# Altium PCB K882-BYKC6252.PcbDoc
Units mm, origin at the board's own origin, x right, y up, seen from the top; angles counter-clockwise.
Board outline 91.58 x 59.79 mm, 2 copper layers (Top, Bottom), stack 0.071 mm thick; 101 components, 70 nets, 257 pads, 142 vias.
Unrouted connection lines stored in the file: 91.
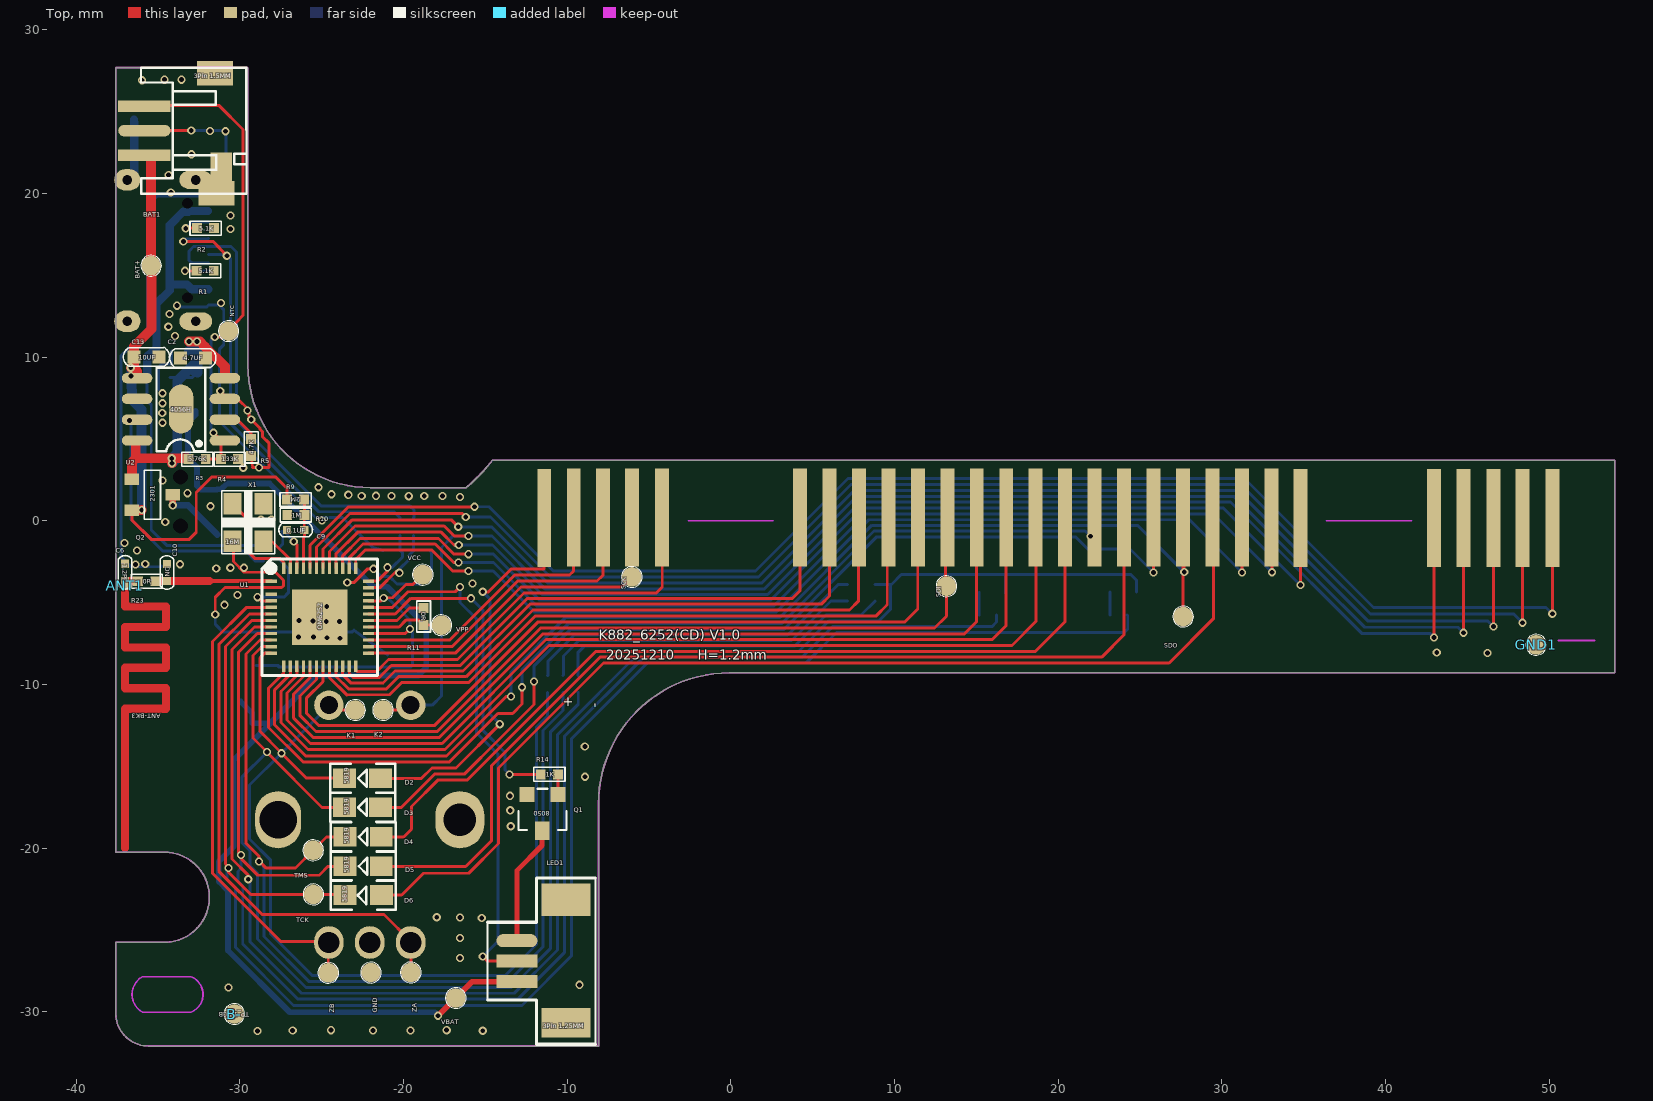
[diagram p0: Top view]
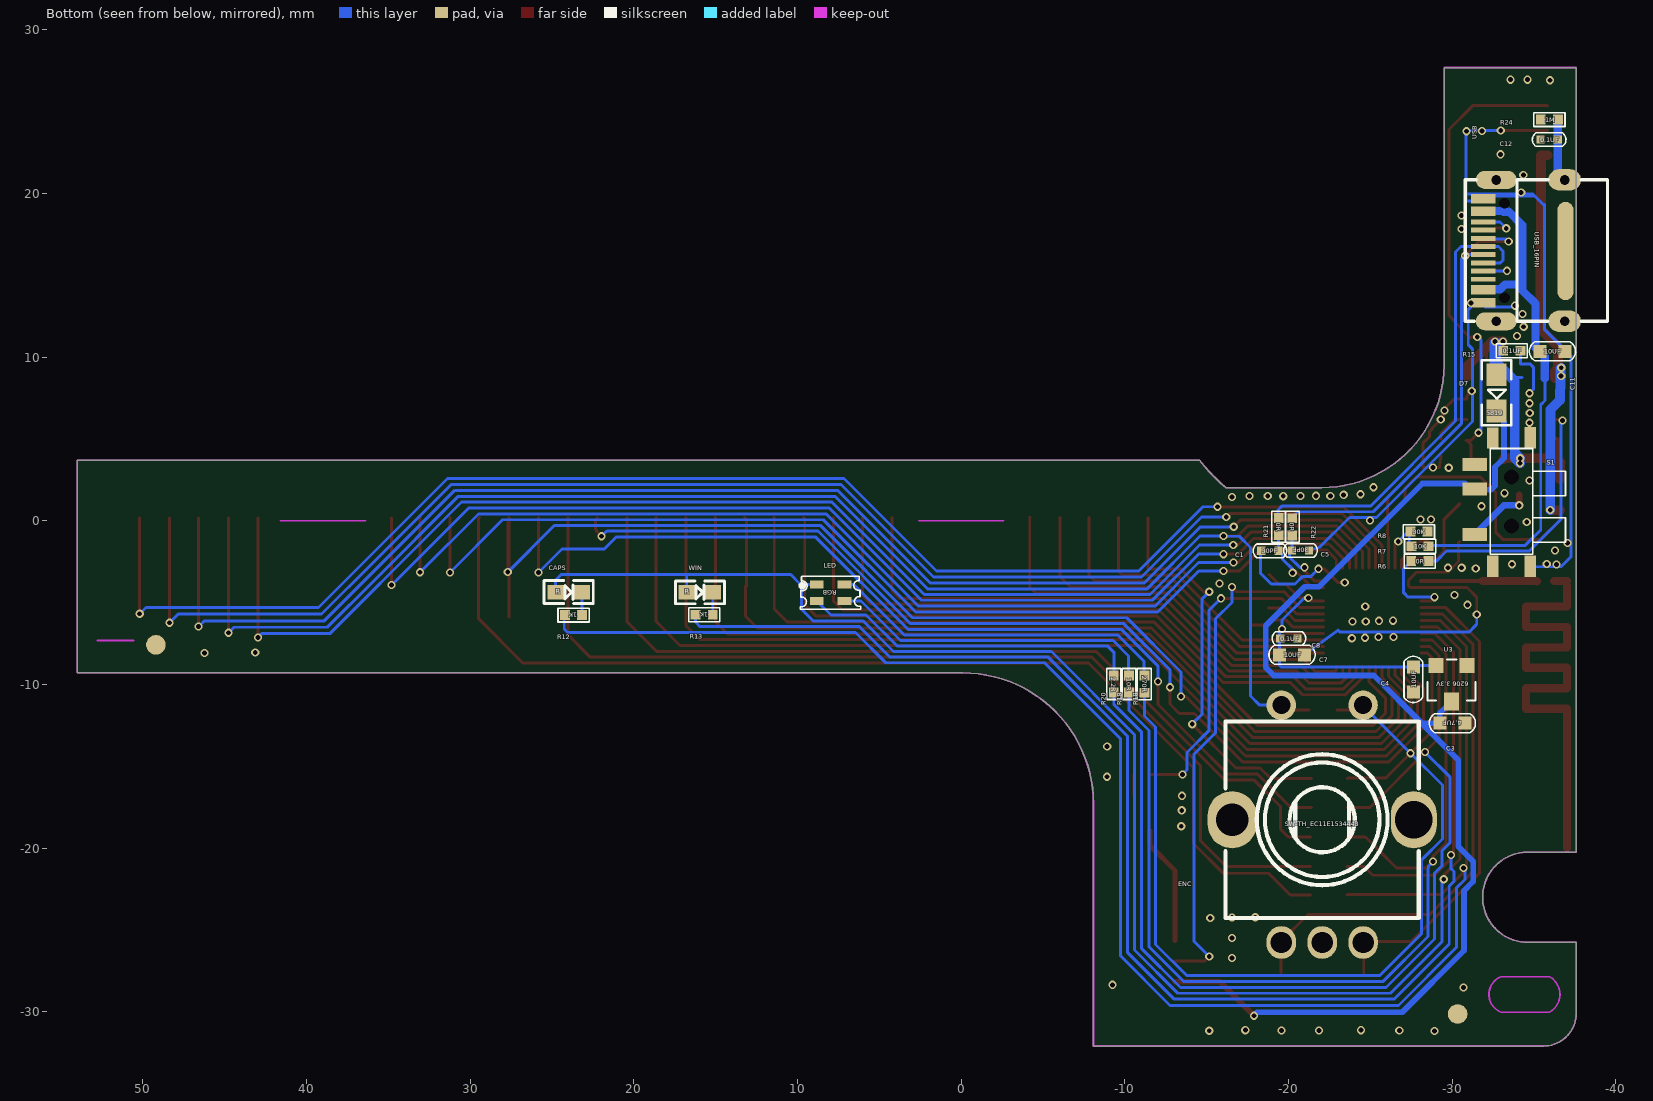
[diagram p1: Bottom view, seen from below]

## Layer stack, top to bottom
Solder Mask Top: solder mask 0.0102, Solder Resist, Dk 3.5
Top: signal copper 0.0356
Bottom: signal copper 0.0356
Solder Mask Bottom: solder mask 0.0102, Solder Resist, Dk 3.5

## Board outline
-34.6,-20.248 cw(c-34.6,-22.998) -34.6,-25.748 -37.575,-25.748 -37.575,-30.09 ccw(c-35.574,-30.09) -35.575,-32.09 -8.075,-32.09 -8.075,-17.291 cw(c-0.075,-17.291) -0.075,-9.291 54.008,-9.291 54.008,3.713 -14.545,3.713 -14.547,3.711 cw(c-23.051,10.308) -16.177,2.026 -22.017,2.026 -22.023,2.026 cw(c-21.996,9.529) -29.499,9.508 -29.507,9.566 -29.507,27.696 -37.575,27.696 -37.575,-20.248

## Design rules (kind name [scope] priority, off if disabled: settings)
Clearance "Clearance - Default - DEFAULT- SMD" [IsVia vs IsSMTPin] p1: gap=0.152 ignorepadtopadclearanceinfootprint=FALSE
Clearance "Clearance - Default - DEFAULT - Via" [IsVia vs IsVia] p2: gap=0.152 ignorepadtopadclearanceinfootprint=FALSE
Clearance "Clearance - Default - DEFAULT - Net" [All] p3: gap=0.152 ignorepadtopadclearanceinfootprint=FALSE except(0: Arc-Hole Track-Hole SMDPad-Hole THPad-Hole Via-Hole Fill-Hole Poly-Hole Region-Hole Text-Hole; 0.2: Arc-Fill Arc-Poly Arc-Region Track-Fill Track-Poly Track-Region SMDPad-Fill SMDPad-Poly SMDPad-Region THPad-Fill THPad-Poly THPad-Region Via-Fill Via-Poly Via-Region; 0.254: Fill-Fill Fill-Poly Fill-Region Poly-Poly Poly-Region Region-Region Text-Text)
ComponentClearance "ComponentClearance - Default - DEFAULT" [All] p1: gap=0.152 collisioncheckmode=3 verticalgap=0.254 showdistances=FALSE
FanoutControl Fanout_Small [(CompPinCount < 5)] p3: bgadir=Out bgaviamode=Centered fanoutstyle=Auto fanoutdirection=OutThenIn viagrid=0.025 // Fanout_Small (Default Rule)
FanoutControl Fanout_SOIC [IsSOIC] p4: bgadir=Out bgaviamode=Centered fanoutstyle=Auto fanoutdirection=Alternating viagrid=0.025 // Fanout_SOIC (Default Rule)
HoleToHoleClearance "HoleToHoleClearance - Default - DEFAULT" [All] p1: gap=0.152 allowstackedmicrovias=TRUE
Length "Default Length" [All] p1: maxlimit=1270 minlimit=0
MaxMinImpedance "Default Impedance" [All] p1: minimum=50.00 maximum=150.0
ParallelSegment "Default Parallel Segment Adjasent" [All] p1: limit=25.4 gap=5.08
ParallelSegment "Default Parallel Segment Same Layer" [All] p2: limit=25.4 gap=5.08
PlaneConnect "Default PlaneConnect" [All] p1: planeconnectstyle=Direct reliefexpansion=0.508 reliefentries=4 reliefconductorwidth=0.381 reliefairgap=0.254
PolygonConnect "PolygonConnect - Default SMT" [IsSMTPin] p1: connectstyle=Direct reliefconductorwidth=0.254 reliefentries=4 polygonreliefangle="45 Angle" airgapwidth=0.254
PolygonConnect "PolygonConnect - Default Pad" [All] p2: connectstyle=Direct reliefconductorwidth=0.381 reliefentries=4 polygonreliefangle="45 Angle" airgapwidth=0.254
RoutingLayers "RoutingLayers - Default - DEFAULT" [All] p1: top layer_v5=TRUE bottom layer_v5=TRUE
RoutingPriority "RoutingPriority - Default - DEFAULT" [All] p1: routingpriority=3
RoutingTopology "Default Routing Topology" [All] p1: topology=Shortest
RoutingVias "RoutingVias - Default - DEFAULT" [All] p1: holewidth=0.3 width=0.5 viastyle="Through Hole" minholewidth=0.3 minwidth=0.5 maxholewidth=0.3 maxwidth=0.5
SMDToCorner "SMDToCorner - Default - DEFAULT" [All] p1: distance=60000
SolderMaskExpansion [All] p1: expansion=0.102 istentingtop=FALSE
Width "Default Width" [All] p1: maxlimit=1 minlimit=0.1 preferedwidth=0.18
22 further rules are at their usual default settings.

## Components (designator, comment, footprint, x,y, rotation, side; value= is the part's Value field where it differs from the comment)
ANT1 "ANT-BK3" ANT-BK3 -37,-6.69 r180 top
B- "TP_1.2CB" TP_1.2CB -30.323,-30.141 r180 top
BAT1 "3Pin 1.5MM" 5P-2.0AB -35.822,23.84 r270 top
BAT+ "" TP_1.2C -35.405,15.58 r180 top
C1 "30PF" 0402C -18.856,-1.831 r180 bottom
C2 "4.7UF" 0603C$2F$2 -32.101,9.948 r180 top
C3 "4.7UF" 0603C$2F$2 -30.764,-12.363 r0 bottom
C4 "10UF" 0603C$2F$2 -27.622,-10.455 r90 bottom
C5 "30PF" 0402C -20.722,-1.808 r0 bottom
C6 "1.2PF" 0402C -36.998,-3.144 r270 top
C7 "10UF" 0603C$2F$2 -19.444,-8.184 r180 bottom
C8 "0.1UF" 0402C -20.016,-7.188 r180 bottom
C9 "0.1UF" 0402C -26.579,-0.551 r0 top
C10 "NC" 0402C -34.448,-3.157 r90 top
C11 "10UF" 0603C -36.112,10.356 r180 bottom
C12 "0.1UF" 0402C -35.919,23.293 r180 bottom
C13 "10UF" 0603C$2F$2 -34.932,10.016 r180 top
CAPS "R" LED-0603 23.989,-4.357 r180 bottom
D2 "5819" 5819__0805 -22.494,-15.733 r90 top
D3 "5819" 5819__0805 -22.494,-17.509 r90 top
D4 "5819" 5819__0805 -22.458,-19.31 r90 top
D5 "5819" 5819__0805 -22.458,-21.11 r90 top
D6 "5819" 5819__0805$2F$2 -22.446,-22.863 r90 top
D7 "5819" 5819__0805$2F$2 -32.702,7.817 r0 bottom
ENC "SW-TH_EC11E1534443" SW-TH_EC11E1534443 -22.05,-18.263 r180 bottom locked
GND "" TP_1.2C -21.977,-27.612 r180 top
GND1 "" TP_1.2CA 49.204,-7.58 r90 top
K1 "" TP_1.2C -22.94,-11.567 r180 top
K2 "" TP_1.2C -21.238,-11.567 r180 top
LED "RGB" RGB 8.163,-4.472 r0 bottom
LED1 "3Pin 1.25MM" SMT1.25MM_-_DUPLICATE -13.073,-26.285 r270 top
NTC "" TP_1.2C -30.672,11.586 r180 top
Q1 "8050" SOT-23 -11.502,-17.83 r180 top
Q2 "2301" SOT-23_3906 -34.088,1.587 r90 top
R1 "5.1K" 0402R -32.634,15.276 r0 top
R2 "5.1K" 0402R -31.56,17.884 r180 top
R3 "5.76K" 0402R -33.12,3.772 r0 top
R4 "133K" 0402R -31.147,3.771 r0 top
R5 "4.7K" 0402R -29.302,3.96 r90 top
R6 "0R" 0402R -28.542,-2.463 r0 bottom
R7 "10K" 0402R -28.552,-1.555 r0 bottom
R8 "30K" 0402R -28.487,-0.658 r0 bottom
R9 "2M" 0402R -26.064,1.303 r180 top
R10 "1M" 0402R -27.095,0.355 r0 top
R11 "0R" 0402R -18.766,-5.319 r270 top
R12 "1K" 0402R 23.167,-5.759 r0 bottom
R13 "1K" 0402R 15.185,-5.739 r0 bottom
R14 "1K" 0402R -11.6,-15.489 r0 top
R15 "0.1UF" 0402R -33.109,10.39 r180 bottom
R18 "270R" 0402R -11.186,-9.45 r270 bottom
R19 "10R" 0402R -10.249,-9.443 r270 bottom
R20 "2.2R" 0402R -9.319,-9.443 r270 bottom
R21 "0R" 0402R -19.392,0.165 r270 bottom
R22 "0R" 0402R -20.217,0.157 r270 bottom
R23 "0R" 0402R -36.206,-3.688 r0 top
R24 "1M" 0402R -36.458,24.517 r0 bottom
S1 "" SW__WPQQ7PIN -33.615,1.188 r90 bottom
SCK "" TP_1.2C -6.051,-3.431 r90 top
SDI "" TP_1.2C 13.173,-3.999 r90 top
SDO "" TP_1.2C 27.638,-5.857 r90 top
TCK "" TP_1.2C -25.492,-22.831 r180 top
TMS "" TP_1.2C -25.502,-20.134 r180 top
U1 "OM6252" QFN-48-1 -25.111,-5.891 r90 top
U2 "4056H" SOT8 -33.587,6.816 r180 top
U3 "6206 3.3V" SOT-23 -29.955,-9.934 r0 bottom
USB "USB_16PIN" USB_16PIN -34.51,16.514 r270 bottom
VBAT "" TP_1.2C -16.804,-29.16 r90 top
VCC "" TP_1.2C -18.804,-3.3 r180 top
VPP "" TP_1.2C -17.661,-6.383 r180 top
WIN "R" LED-0603 15.976,-4.366 r180 bottom
X1 "16M" 3225 -29.502,-0.107 r270 top
ZA "" TP_1.2C -19.54,-27.6 r180 top
ZB "" TP_1.2C -24.582,-27.624 r180 top
? "" FPAD_6 50.2,0.293 r180 top
? "" FPAD_6$2F$4 48.4,0.293 r180 top
? "" FPAD_6 46.6,0.293 r180 top
? "" FPAD_6$2F$4 44.8,0.293 r180 top
? "" FPAD_6$2F$4 43,0.293 r180 top
? "" FPAD_6$2F$4 34.835,0.293 r180 top
? "" FPAD_6$2F$2 33.035,0.293 r180 top
? "" FPAD_6$2F$2 31.235,0.293 r180 top
? "" FPAD_6$2F$2 9.635,0.293 r180 top
? "" FPAD_6$2F$2 7.835,0.293 r180 top
? "" FPAD_6$2F$2 27.635,0.293 r180 top
? "" FPAD_6$2F$3 -5.991,0.293 r180 top
? "" FPAD_6$2F$2 -7.791,0.293 r180 top
? "" FPAD_6$2F$2 -9.591,0.293 r180 top
? "" FPAD_6$2F$5 -11.391,-0.234 r180 top
? "" FPAD_6$2F$2 25.835,0.293 r180 top
? "" FPAD_6$2F$2 29.435,0.293 r180 top
? "" FPAD_6$2F$2 24.035,0.293 r180 top
? "" FPAD_6$2F$2 18.635,0.293 r180 top
? "" FPAD_6$2F$2 16.835,0.293 r180 top
? "" FPAD_6$2F$2 11.435,0.293 r180 top
? "" FPAD_6$2F$2 13.235,0.293 r180 top
? "" FPAD_6$2F$2 15.035,0.293 r180 top
? "" FPAD_6$2F$2 6.035,0.293 r180 top
? "" FPAD_6$2F$2 4.235,0.293 r180 top
? "" FPAD_6$2F$2 -4.191,0.293 r180 top
? "" FPAD_6$2F$2 20.435,0.293 r180 top
? "" FPAD_6$2F$2 22.235,0.293 r180 top

## Footprints (in the part's own frame and the unit in brackets; to place one, negate y for a bottom-side part, rotate by r counter-clockwise, add the part's x,y. Pads: shape width x height; smd on the part's side, far side on the other; paste and mask are expansions set on the pad)
5P-2.0AB [mm]
  rect 0.7x3.2 smd: 3(-1.5,0) 5(1.5,0)
  oval 0.7x3.2 smd: 4(0,0)
  rect 1.5x2.2 smd: 8(-3.5,4.3) 9(3.832,4.396)
  rect 2.2x1.3 smd: 12(2.431,4.703)
  silkscreen extent -3.84,-0.21 3.86,6.24
0402C [mm]
  rect 0.5x0.5 smd: 1(-0.525,0) 2(0.525,0)
  silkscreen extent -1.03,-0.42 1.02,0.41
0402R [mm]
  rect 0.6x0.6 smd: 1(0,0) 2(1.05,0)
  silkscreen extent -0.42,-0.42 1.48,0.42
0603C [mm]
  rect 0.8x0.8 smd: 1(-0.762,0) 2(0.762,0)
  silkscreen extent -1.41,-0.58 1.41,0.58
0603C$2F$2 [mm]
  rect 0.8x0.8 smd: 1(0,0) 2(1.524,0)
  silkscreen extent -0.65,-0.58 2.17,0.58
3225 [mm]
  rect 1.3x1.1 smd: 1(1.147,0.954) 2(1.147,-0.946) 3(-1.153,-0.946) 4(-1.153,0.954)
  silkscreen extent -1.95,-1.6 1.9,1.65
5819__0805 [mm]
  rect 1.2x1.4 smd: 1(0,-1.11) 2(0,1.11)
  silkscreen extent -0.89,-1.99 0.89,1.98
5819__0805$2F$2 [mm]
  rect 1.2x1.4 smd: 1(0,-1.11) 2(0,1.11)
  silkscreen extent -0.89,-1.99 0.89,1.98
ANT-BK3 [mm]
  rect 0.5x0.5 smd: 1(0,-2.71)
  Top lines w0.5: 0,13.29 0,4.79 -2.5,4.79 -2.5,3.54 0,3.54 0,2.29 -2.5,2.29 -2.5,1.04 0,1.04 0,-0.21 -2.5,-0.21 -2.5,-1.46 0,-1.46 0,-2.623 0,-2.631 0,-2.71
FPAD_6 [mm]
  rect 0.85x6 smd: 1(0,0.118)
FPAD_6$2F$2 [mm]
  rect 0.85x6 smd: 1(0,0.088)
FPAD_6$2F$3 [mm]
  rect 0.85x6 smd: 1(0.039,0.088)
FPAD_6$2F$4 [mm]
  rect 0.85x6 smd: 1(0.02,0.115)
FPAD_6$2F$5 [mm]
  rect 0.85x6 smd: 1(0,-0.412)
LED-0603 [mm]
  rect 1x0.9 smd: 1(0.8,0) 2(-0.8,0)
  silkscreen extent -1.5,-0.7 1.5,0.7
QFN-48-1 [mm]
  rect 0.2x0.7 smd: 1(2.205,2.973) 3(1.405,2.973) 4(1.005,2.973) 5(0.605,2.973) 6(0.205,2.973) 7(-0.195,2.973) 8(-0.595,2.973) 9(-0.995,2.973) 10(-1.395,2.973) 11(-1.795,2.973) 12(-2.195,2.973) 25(-2.195,-2.98) 26(-1.795,-2.98) 27(-1.395,-2.98) 28(-0.995,-2.98) 29(-0.595,-2.98) 30(-0.195,-2.98) 31(0.205,-2.98) 32(0.605,-2.98) 33(1.005,-2.98) 34(1.405,-2.98) 35(1.805,-2.98) 36(2.205,-2.98)
  round 0 all layers, no hole: 2(0,0)
  rect 0.7x0.2 smd: 13(-2.996,2.196) 14(-2.996,1.796) 15(-2.996,1.396) 16(-2.996,0.996) 17(-2.996,0.596) 18(-2.996,0.196) 19(-2.996,-0.204) 20(-2.996,-0.604) 21(-2.996,-1.004) 22(-2.996,-1.404) 23(-2.996,-1.804) 24(-2.996,-2.204) 37(3.006,-2.204) 38(3.006,-1.804) 39(3.006,-1.404) 40(3.006,-1.004) 41(3.006,-0.604) 42(3.006,-0.204) 43(3.006,0.196) 44(3.006,0.596) 45(3.006,0.996) 46(3.006,1.396) 47(3.006,1.796) 48(3.006,2.196)
  rect 3.4x3.4 smd: 49(0.005,-0.004)
  silkscreen extent -3.56,-3.53 3.56,3.52
RGB [mm]
  rect 0.85x0.5 smd: 1(-1.033,0.418) 2(0.667,0.418) 3(-1.033,-0.582) 4(0.667,-0.582)
  silkscreen extent -2.01,-1.09 1.68,0.92
SMT1.25MM_-_DUPLICATE [mm]
  rect 2x3 smd: 0(-3.132,3.009)
  rect 1.8x3 smd: 0/2(4.368,3.009)
  oval 0.8x2.5 smd: 1(-0.632,0.009)
  rect 0.8x2.5 smd: 2(0.618,0.009) 3(1.868,0.009)
  silkscreen extent -4.46,-1.79 5.69,4.81
SOT8 [mm]
  oval 1.865x0.63 smd: 1(-2.682,1.905) 2(-2.682,0.635) 3(-2.682,-0.635) 4(-2.682,-1.905) 5(2.682,-1.905) 6(2.682,-0.635) 7(2.682,0.635) 8(2.682,1.905)
  oval 1.5x3 smd: 9(-0.005,-0.018)
  silkscreen extent -1.5,-2.55 1.5,2.55
SOT-23 [mil]
  rect 36x36 smd: 1(-37.5,-43.48) 2(37.5,-43.48)
  rect 36x43.94 smd: 3(0.5,43.48)
  silkscreen extent -58,-57 58,42
SOT-23_3906 [mm]
  rect 0.7x0.9 smd: 1(0.96,2.5) 2(-0.94,2.5) 3(0,0)
  silkscreen extent -1.5,0.75 1.5,1.75
SW-TH_EC11E1534443 [mm]
  oval 3x3.5 hole 1.981: 6(-5.5,0)
  oval 2.8x3.5 hole 2.286: 7(5.6,0)
  oval 1.8x2 hole 1.3: A(2.5,-7.5) B(-2.5,-7.5) C(0,-7.5)
  round 1.8 hole 1.1: D(-2.5,7) E(2.5,7)
  silkscreen extent -5.9,-6 5.9,6
SW__WPQQ7PIN [mm]
  rect 0.8x1.5 smd: 1(-2.027,2.248) 2(0.747,2.248) 3(2.247,2.248)
  round 0.025 hole 0.9: 8(-1.503,-0.001) 9(1.497,-0.001)
  rect 1.3x0.7 smd: $$$1(-3.953,-1.156) $$$2(3.889,-1.146) $$$3(3.874,1.147) $$$4(-3.953,1.137)
  silkscreen extent -3.24,-3.3 3.23,1.3
TP_1.2C [mm]
  round 1.2 smd: 1(0.006,-0.009)
  silkscreen extent -0.63,-0.64 0.64,0.63
TP_1.2CA [mm]
  round 1.2 / inner round 0 / far side round 1.2 all layers, no hole: 1(0.006,-0.009)
  silkscreen extent -0.63,-0.64 0.64,0.62
TP_1.2CB [mm]
  round 1.2 / inner round 0 / far side round 1.2 all layers, no hole: 1(0.006,-0.009)
  silkscreen extent -0.63,-0.64 0.64,0.63
USB_16PIN [mm]
  oval 1.3x2 / inner oval 1.3x2 / far side oval 1.3x1.6 hole 0.6: 1(-4.32,2.357) 3(4.32,2.357)
  oval 1.1x2.5 / inner oval 1.1x2.5 / far side oval 1.1x2 hole 0.6: 2(-4.32,-1.823) 4(4.32,-1.823)
  oval 6x1 smd: 5(0.023,2.408)
  round 0 hole 0.65: 6(-2.89,-1.323) 7(2.89,-1.323)
  rect 0.3x1.5 smd: A1(3.319,-2.607) A4(2.54,-2.607) A5(1.25,-2.607) A6(0.25,-2.607) A7(-0.25,-2.607) A8(1.75,-2.607) A9(-2.25,-2.607) A12(-3.04,-2.607) B1(-3.319,-2.607) B4(-2.54,-2.607) B5(-1.75,-2.607) B6(-0.75,-2.607) B7(0.75,-2.607) B8(-1.25,-2.607) B9(2.25,-2.607) B12(3.04,-2.607)
  silkscreen extent -4.32,-3.71 4.32,4.97

## Via types
v1: diameter 0.5, hole 0.3, Top to Bottom, 142 vias

## Nets (pads, with @x,y where several pads share a name; then routed paths per layer and width w, separated by ;. In a path a pad name is that pad's centre, name@x,y a point inside that pad or via, vN(x,y) a via of type N, cw(c..) or ccw(c..) an arc to the next point about the centre after c; other vN are vias at no path point)
5V: C2.1 D7.1 Q2.1 R3.1 R15.1 U2.4 U2.8 | length 27.4
  Top w0.18: U2.8@-36.363,4.818 U2.8 ; C2.1 -32.101,10.625 ; U2.4 U2.4@-30.905,8.82 ; v1(-32.604,10.955) v1@-32.58,11.104 ; v1(-32.604,10.955) -33.152,11.104 -33.11,10.979 -33.105,10.974 v1(-33.105,10.963) -33.095,10.973 -33.07,10.973 v1@-32.596,11.104 ; v1(-32.604,10.955) -32.566,11.09 v1@-32.58,11.104 ; v1@-32.596,11.104 v1@-32.58,11.104 ; v1@-32.596,11.104 v1@-32.58,11.104
  Top w0.6: Q2.1 -36.589,3.554 -36.605,3.57 -36.347,3.829 ; U2.8@-36.363,4.818 -36.347,4.802 -36.347,3.829 ; v1(-34.139,3.52) -34.152,3.52 v1(-34.152,3.82) -34.161,3.829 -34.598,3.829 ; R3.1 -33.177,3.829 -34.598,3.829 ; v1(-33.105,10.963) v1@-33.073,10.963 ; v1@-33.07,10.973 -33.073,10.969 v1@-33.073,10.963 ; v1(-32.604,10.955) v1@-32.587,10.955 ; -32.101,10.625 -32.139,10.663 ; U2.4@-30.905,8.82 -30.905,9.429 -32.139,10.663 ; -36.347,3.829 -34.598,3.829 ; v1@-33.073,10.963 -32.596,10.963 v1@-32.587,10.955 ; v1@-32.587,10.955 -32.431,10.955 -32.139,10.663
  Bottom w0.18: -34.25,8.75 -32.879,8.75 D7.1 ; v1@-32.601,10.949 v1@-32.585,10.934 ; D7.1@-32.58,9.05 D7.1 ; v1@-32.58,10.881 -32.58,10.928 -32.601,10.949 -32.601,11.024 v1@-32.615,11.037 ; v1@-32.58,10.929 v1@-32.585,10.934 ; D7.1 -32.707,8.922 -32.728,8.942 -32.87,8.942 -32.87,10.822 v1(-33.105,10.963) -32.846,11.039 -32.616,11.039 v1@-32.615,11.037 ; v1@-32.615,11.037 v1(-32.604,10.955) v1@-32.585,10.934
  Bottom w0.6: v1(-34.139,3.52) -33.839,3.82 ; R15.1 -32.58,10.39 ; D7.1@-32.58,9.05 -32.58,9.789 ; v1@-32.58,10.881 -32.58,10.39 ; -33.839,3.82 -33.811,3.848 -33.811,4.161 ; -33.839,3.82 v1(-34.152,3.82) -33.811,4.161 ; -33.811,4.161 -33.811,8.558 -32.58,9.789 ; -32.58,9.789 -32.58,10.39
$$$1: Q2.3 S1.1 | length 4.1
  Top w0.4: v1(-34.088,0.948) Q2.3
  Bottom w0.4: v1(-34.088,0.948) -33.155,0.948 S1.1
BAT+: BAT1.5 BAT+.1 C13.2 Q2.2 R9.2 U2.5 | length 40.3
  Top w0.18: v1(-36.652,8.851) -36.642,8.721 U2.5 ; Q2.2@-36.508,0.647 Q2.2 -36.588,0.056 -35.404,-1.128 -33.08,-1.128 ; -33.08,-1.128 -32.655,-0.703 -32.655,1.728 -31.692,2.691 -27.814,2.691 -27.114,1.991 R9.2
  Top w0.6: v1(-36.654,9.353) v1@-36.456,9.353 ; Q2.2 -36.508,0.647 v1(-35.985,0.655) ; C13.2 -36.456,10.664 ; U2.5 -36.27,9.135 v1@-36.456,9.353 ; BAT1.5 -35.4,22.34 -35.411,22.329 BAT+.1 -35.39,15.567 -35.39,11.731 -36.456,10.664 ; v1@-36.456,9.353 -36.456,10.664
  Bottom w0.18: v1(-36.652,8.851) -36.619,8.744 v1@-36.619,8.778
  Bottom w0.6: v1(-36.654,9.353) -36.619,9.318 v1@-36.619,8.778 ; v1(-36.652,8.851) -36.619,8.721 -36.576,7.372 -35.999,6.795 -35.985,3.065 v1(-35.985,0.655)
C0: ?.1@22.235,0.205 U1.13 | length 63.8
  Top w0.18: U1.13 -27.308,-9.297 -28.239,-10.228 -28.239,-12.618 -26.116,-14.741 -17.193,-14.741 -14.227,-11.775 -13.322,-11.775 -12.745,-11.198 v1(-12.745,-10.168) ; v1(21.979,-0.943) 22.298,-0.623 22.298,-0.56 22.348,-0.511 22.348,0.089 22.235,0.201 ?.1@22.235,0.205
  Bottom w0.18: v1@-12.745,-10.168 -12.745,-9.1 -9.927,-6.282 3.103,-6.282 8.762,-0.624 21.66,-0.624 ; 21.66,-0.624 v1(21.979,-0.943)
C1: D4.2 R19.2 TMS.1 U1.10 | length 60.9
  Top w0.18: U1.10 -28.766,-7.285 -29.614,-8.134 -29.614,-14.696 -29.614,-19.701 -28.826,-20.489 v1(-28.826,-20.819) -28.773,-20.819 -28.372,-21.22 -28.368,-21.215 -26.597,-21.215 TMS.1 -24.692,-19.31 D4.2
  Bottom w0.18: v1(-28.826,-20.819) -28.554,-21.092 -28.508,-21.345 -28.508,-25.404 -25.757,-28.155 -13.602,-28.155 -11.472,-26.025 -11.472,-12.814 -10.249,-11.591 R19.2
C2: D3.2 R20.2 U1.11 | length 62.6
  Top w0.18: U1.11 -28.645,-7.685 -29.193,-8.234 -29.193,-13.271 -28.34,-14.125 v1(-28.34,-14.128) -28.34,-14.141 -24.972,-17.509 D3.2
  Bottom w0.18: v1(-28.34,-14.128) -28.34,-14.135 -29.872,-15.668 -29.872,-19.66 -29.359,-20.173 -29.359,-21.09 -28.919,-21.53 -28.919,-25.545 -25.956,-28.507 -13.388,-28.507 -11.022,-26.142 -11.022,-12.918 -9.315,-11.21 -9.315,-10.497 R20.2
C3: D2.2 ENC.E K1.1 R18.2 U1.12 | length 63.6
  Top w0.18: U1.12 -28.483,-8.085 -28.767,-8.369 -28.767,-12.847 -28.767,-12.856 -27.446,-14.177 v1(-27.446,-14.2) -27.446,-14.199 -25.938,-15.707 -23.63,-15.707 D2.2 ; ENC.E -24.259,-11.554 -24.259,-11.558 K1.1
  Bottom w0.18: -29.394,-19.438 -29.394,-16.147 -27.447,-14.2 -24.55,-11.304 ENC.E ; -29.393,-19.438 -28.129,-20.701 -28.129,-25.219 -28.122,-25.226 -28.122,-25.231 -25.572,-27.781 -13.771,-27.781 -11.867,-25.877 -11.867,-12.601 -11.186,-11.92 R18.2
C4: ?.1@-9.591,0.205 U1.27 | length 17.6
  Top w0.18: U1.27 -17.161,-7.286 -13.188,-3.312 -9.852,-3.312 -9.612,-3.073 -9.591,-3.073 ?.1@-9.591,0.205
C5: ?.1@-7.791,0.205 U1.26 | length 19.7
  Top w0.18: U1.26 -17.02,-7.686 -13.015,-3.68 -8.163,-3.68 -7.82,-3.337 -7.807,-3.337 -7.807,0.188 ?.1@-7.791,0.205
C6: ?.1@-6.03,0.205 SCK.1 U1.25 | length 26.8
  Top w0.18: U1.25 -16.851,-8.086 ; -13.173,-4.423 -16.835,-8.086 -16.851,-8.086 ; ?.1@-6.03,0.205 -6.042,0.192 SCK.1 -6.052,-3.425 -6.67,-4.042 -12.808,-4.042 -16.851,-8.086
C7: ?.1@27.635,0.205 SDO.1 U1.14 | length 83.5
  Top w0.18: U1.14 -26.908,-9.374 -27.86,-10.326 -27.86,-12.481 -25.967,-14.374 -17.357,-14.374 -13.716,-10.734 v1(-13.426,-10.734) ; v1(27.714,-3.134) 27.714,-0.141 ?.1@27.647,-0.074 ; ?.1@27.647,-0.074 27.647,0.192 27.635,0.205 27.635,-5.863 SDO.1 ?.1@27.647,-0.074
  Bottom w0.18: v1(-13.426,-10.734) -13.426,-9.243 -10.105,-5.922 2.975,-5.922 8.623,-0.274 24.854,-0.274 v1(27.714,-3.134)
C8: ?.1@7.835,0.205 U1.21 | length 40.2
  Top w0.18: U1.21 -24.108,-9.503 -23.324,-10.287 -21.061,-10.287 -20.298,-9.524 -16.163,-9.524 -12.083,-5.444 7.245,-5.444 7.25,-5.439 7.263,-5.439 7.819,-4.883 7.819,0.189 ?.1@7.835,0.205
C9: ?.1@9.635,0.205 U1.20 | length 42.8
  Top w0.18: U1.20 -24.508,-9.581 -23.458,-10.63 -23.455,-10.627 -20.845,-10.627 -20.109,-9.89 -16.013,-9.89 -11.926,-5.803 8.897,-5.803 9.556,-5.145 9.556,-5.116 9.567,-5.104 9.567,0.137 ?.1@9.635,0.205
C10: ?.1@-4.191,0.205 U1.24 | length 25.4
  Top w0.18: U1.24 -22.908,-9.129 -22.835,-9.201 -21.629,-9.201 -20.906,-8.479 -16.697,-8.479 -12.623,-4.405 -4.549,-4.405 -4.182,-4.038 -4.182,0.195 ?.1@-4.191,0.205
C11: ?.1@4.235,0.205 U1.23 | length 34.7
  Top w0.18: U1.23 -23.308,-9.321 -23.07,-9.558 -21.465,-9.558 -20.737,-8.831 -16.524,-8.831 -12.436,-4.743 3.76,-4.743 4.232,-4.272 4.232,0.201 ?.1@4.235,0.205
C12: ?.1@6.035,0.205 U1.22 | length 37.5
  Top w0.18: U1.22 -23.708,-9.399 -23.19,-9.917 -21.259,-9.917 -21.251,-9.908 -21.245,-9.908 -20.515,-9.178 -16.348,-9.178 -12.26,-5.09 5.532,-5.09 6.033,-4.59 6.042,-4.59 6.042,0.197 ?.1@6.035,0.205
C13: ?.1@15.035,0.205 U1.17 | length 55.1
  Top w0.18: U1.17 -25.708,-9.591 -26.722,-10.605 -26.722,-12.028 -25.522,-13.228 -17.787,-13.228 -11.463,-6.904 14.291,-6.904 15.026,-6.169 15.03,-6.169 15.03,0.199 ?.1@15.035,0.205
C14: ?.1@13.235,0.205 SDI.1 U1.18 | length 52.4
  Top w0.18: U1.18 -25.308,-9.687 -26.315,-10.694 -26.325,-10.705 -26.325,-11.874 -26.325,-11.884 -25.341,-12.868 -17.928,-12.868 -11.608,-6.548 12.437,-6.548 12.439,-6.546 12.461,-6.546 13.182,-5.825 SDI.1 13.137,-4.006 13.137,0.107 ?.1@13.235,0.205
C15: ?.1@11.435,0.205 U1.19 | length 49.5
  Top w0.18: U1.19 -24.908,-9.825 -25.927,-10.844 -25.927,-11.742 -25.151,-12.517 -18.108,-12.517 -11.76,-6.17 10.645,-6.17 ; 10.645,-6.17 11.428,-5.387 11.428,0.198 ?.1@11.435,0.205
C16: ?.1@16.835,0.205 U1.16 | length 57.8
  Top w0.18: U1.16 -26.108,-9.515 -27.08,-10.487 -27.105,-10.513 -27.105,-12.169 -25.673,-13.601 -17.626,-13.601 -11.281,-7.256 15.98,-7.256 16.824,-6.412 ; 16.824,-6.412 16.824,0.194 ?.1@16.835,0.205
C17: ?.1@18.635,0.205 U1.15 | length 60.2
  Top w0.18: U1.15 -26.508,-9.445 -27.453,-10.391 -27.477,-10.415 -27.475,-10.417 -27.475,-12.317 -25.829,-13.963 -17.451,-13.963 -11.1,-7.612 17.184,-7.612 18.645,-6.151 18.649,-6.151 18.649,0.19 ?.1@18.635,0.205
C18: D5.2 R13.2 U1.9 | length 92.9
  Top w0.18: U1.9 -28.919,-6.885 -28.921,-6.885 -30.065,-8.029 -30.065,-20.175 -30.065,-20.257 -30.064,-20.257 v1(-29.912,-20.41) -29.879,-20.442 -29.879,-20.671 -28.896,-21.654 -25.15,-21.654 -25.13,-21.634 -25.128,-21.634 -24.604,-21.11 D5.2
  Bottom w0.18: v1(-29.912,-20.41) -29.912,-21.225 -30.103,-21.417 -30.103,-22.027 -29.814,-22.316 -29.814,-25.851 -26.462,-29.203 -12.987,-29.203 -10.166,-26.383 -10.166,-13.176 -5.319,-8.328 4.355,-8.328 6.218,-6.465 15.958,-6.465 16.235,-6.188 R13.2
C19: D6.2 R12.2 TCK.1 U1.7 | length 104.5
  Top w0.18: U1.7 -29.186,-6.085 -29.264,-6.085 -30.86,-7.681 -30.86,-20.976 -30.69,-21.146 v1(-30.69,-21.206) -30.692,-21.208 -30.692,-21.451 -29.322,-22.822 TCK.1 -23.597,-22.822 D6.2
  Bottom w0.17: v1(-30.69,-21.206) -30.774,-21.1 -30.774,-21.849 -30.768,-21.855 -30.768,-21.915 -30.264,-22.42 -30.264,-26.036 -30.27,-26.043 -26.709,-29.604 -12.76,-29.604 -9.729,-26.572 -9.729,-13.314 -5.083,-8.668 4.618,-8.668 6.468,-6.817 24.058,-6.817 24.257,-6.618 24.257,-5.799 R12.2
C/1: ?.1@20.435,0.205 D4.1 | length 54.4
  Top w0.18: D4.1 -19.978,-19.31 -19.507,-18.839 -19.507,-17.451 -17.902,-15.846 -16.106,-15.846 -8.232,-7.971 18.627,-7.971 20.397,-6.201 20.397,-6.194 20.427,-6.164 20.427,0.197 ?.1@20.435,0.205
C/2: ?.1@25.835,0.205 D3.1 | length 59.7
  Top w0.18: D3.1 -20.127,-17.509 -18.095,-15.477 -17.202,-15.477 -16.275,-15.477 -14.159,-13.36 -12.02,-11.222 v1(-12.02,-9.807) ; v1(25.835,-3.159) ?.1@25.835,0.205
  Bottom w0.18: v1(-12.02,-9.807) -12.005,-9.791 -12.005,-8.86 -9.77,-6.625 3.261,-6.625 8.889,-0.998 21.091,-0.998 21.818,-1.725 24.401,-1.725 v1(25.835,-3.159)
C/3: ?.1@-11.391,0.178 D2.1 | length 24.6
  Top w0.18: D2.1 -18.888,-15.733 -18.257,-15.102 -16.792,-15.102 v1(-14.112,-12.422) ; v1(-15.151,-4.33) -15.151,-4.338 -14.798,-4.338 -13.391,-2.931 -11.399,-2.931 -11.399,0.169 ?.1@-11.391,0.178
  Bottom w0.18: v1(-15.151,-4.33) -14.716,-4.765 -14.716,-5.093 -14.716,-11.797 -14.112,-12.4 v1(-14.112,-12.422)
C/18: ?.1@24.035,0.205 D5.1 | length 61.1
  Top w0.18: D5.1 -16.194,-21.11 -16.177,-21.094 -16.163,-21.094 -14.626,-19.556 -14.626,-14.978 -7.977,-8.329 22.665,-8.329 24.033,-6.961 24.035,-6.961 ?.1@24.035,0.205
C/19: ?.1@29.435,0.205 D6.1 | length 66.7
  Top w0.18: D6.1 -20.101,-22.863 -18.77,-21.531 -16.01,-21.531 -14.186,-19.707 -14.186,-15.096 -7.773,-8.683 26.79,-8.683 26.79,-8.681 29.487,-5.984 29.487,0.153 ?.1@29.435,0.205
CHECK_5V: R7.2 R8.2 U1.46 | length 3.7
  Top w0.18: v1(-26.696,-1.26) -26.508,-1.448 U1.46
  Bottom w0.18: R7.2 -27.368,-1.421 -27.368,-0.727 R8.2 -27.298,-0.658 v1(-26.696,-1.26)
CHR_OK: R6.2 U1.4 | length 5.1
  Top w0.18: v1@-28.92,-4.664 -28.698,-4.886 U1.4
  Bottom w0.18: v1(-28.92,-4.664) -27.3,-4.664 -27.028,-4.393 -27.028,-2.912 -27.477,-2.463 R6.2
D+: R22.1 USB.A6 USB.B6 | length 28.9
  Top w0.18: v1(-33.444,17.077) -31.636,17.077 v1(-30.787,16.196)
  Bottom w0.18: v1(-33.444,17.077) -33.288,17.234 -31.932,17.234 USB.B6 ; USB.A6 -30.822,16.264 v1(-30.787,16.196) -30.552,16.029 -30.552,5.938 -25.17,0.556 -20.568,0.556 -20.217,0.205 R22.1
D-: R21.1 USB.A7 USB.B7 | length 28.9
  Bottom w0.18: USB.B7 -32.934,15.764 -33.08,15.91 -33.08,15.914 -33.084,15.918 -33.084,16.494 -32.815,16.763 USB.A7 -30.53,16.764 -30.194,16.428 -30.194,6.097 -24.996,0.898 -19.584,0.898 -19.347,0.661 -19.347,0.21 R21.1
DM: C1.2 R21.2 U1.35 | length 5
  Top w0.18: U1.35 -21.44,-4.086 -20.481,-3.127 -20.295,-3.127 v1(-20.246,-3.176)
  Bottom w0.18: v1(-20.246,-3.176) -20.246,-2.959 -19.616,-2.329 -19.616,-2.065 C1.2 -19.381,-1.48 -19.392,-1.47 R21.2
DP: C5.2 R22.2 U1.36 | length 4.3
  Top w0.18: U1.36 -21.595,-3.686 -20.953,-3.043 -20.947,-3.043 -20.947,-2.87 v1(-20.978,-2.839)
  Bottom w0.18: v1(-20.978,-2.839) -20.672,-2.839 -20.051,-2.218 -20.051,-1.923 -20.082,-1.923 C5.2 -20.197,-0.913 R22.2
GND: BAT1.4 BAT1.8 C1.1 C2.2 C3.1 C4.1 C5.1 C6.1 C7.2 C8.2 C9.1 C10.2 C11.2 C12.1 C13.1 ENC.6 ENC.7 ENC.C GND.1 LED1.0 LED1.0/2 Q1.2 R1.2 R2.1 R4.2 R5.1 R8.1 R10.1 R15.2 R24.2 S1.$$$1 S1.$$$2 S1.$$$3 S1.$$$4 U1.49 U2.3 U2.9 U3.1 USB.A1 USB.A12 USB.B1 USB.B12 X1.2 X1.4 | length 108.2
  Top w0.18: BAT1.4 v1(-32.961,23.84) ; v1(-31.492,-5.73) -31.492,-4.665 -30.899,-4.072 -27.433,-4.072 -27.326,-3.965 -27.326,-3.635 -27.82,-3.142 -29.722,-3.142 -30.377,-2.487 -30.377,-1.326 X1.2 ; v1(-31.185,7.928) -30.905,7.648 U2.3 -30.118,7.451 -29.437,6.771 -29.437,6.335 -28.749,5.647 -28.749,5.57 -28.734,5.57 -28.616,5.452 -28.616,5.156 -28.199,4.739 -28.199,4.393 -28.199,3.261 -29.204,3.261 R5.1 ; v1(-23.429,-3.772) -23.038,-3.772 -23.028,-3.782 -22.177,-2.931 v1(-21.831,-2.931)
  Bottom w0.18: S1.$$$1 -34.81,-2.805 -36.643,-2.805 -37.24,-2.209 -37.24,10.087 -35.622,11.704 -35.622,19.315 -35.576,19.315 -35.038,19.854 ; v1(-34.721,7.796) -34.952,8.028 -34.952,9.382 -34.742,9.592 -34.158,9.592 -34.158,10.389 R15.2 ; v1(-33.827,13.147) -33.729,13.147 -33.645,13.056 -32.041,13.056 USB.A1 -31.271,13.195 -30.973,12.896 -30.973,10.76 -31.222,10.511 v1@-31.222,7.928 ; v1(-32.961,23.84) -30.824,23.84 -30.824,19.968 ; USB.A12 -30.849,19.554 -30.824,19.579 -30.824,19.968 ; USB.B1 -33.541,19.833 -33.562,19.854 -35.038,19.854 ; v1(-31.492,-5.73) -31.492,-6.306 -31.446,-6.352 -31.446,-6.364 -31.439,-6.371 -31.439,-6.383 -31.043,-6.779 -23.117,-6.779 -23.018,-6.679 C7.2 ; v1(-31.185,7.928) v1@-31.222,7.928 ; v1(-21.831,-2.931) -21.373,-3.389 -20.867,-3.389 -20.392,-3.864 -18.941,-3.864 -18.284,-3.208 -18.284,-1.921 -18.32,-1.885 -18.32,-1.842 C1.1 ; C5.1 -21.923,-1.589 -23.718,0.206 -25.372,0.206 -31.231,6.065 v1@-31.222,7.928 ; -35.038,19.854 -34.924,19.968 -30.824,19.968
  other v1: -28.921,-31.178 -26.762,-31.148 -21.85,-31.148 -19.572,-31.148 -15.148,-31.153 -24.424,-31.119 -17.353,-31.119 -30.688,-28.522 -9.238,-28.349 -16.545,-26.705 -16.545,-25.484 -15.21,-24.259 -16.546,-24.231 -17.957,-24.22 -13.438,-18.661 -13.471,-17.687 -13.493,-16.801 -8.901,-15.634 -8.912,-13.782 46.246,-8.076 43.14,-8.047 -23.86,-7.171 -24.671,-7.141 -26.406,-7.103 -25.481,-7.087 -24.709,-6.155 -23.906,-6.147 -26.383,-6.101 -25.527,-6.109 -24.678,-5.23 -30.932,-5.13 -30.138,-4.531 -15.785,-3.824 -31.435,-2.911 -30.573,-2.863 -29.745,-2.863 -36.369,-2.674 -35.773,-2.635 -33.647,-2.651 -36.266,-1.804 -37.047,-1.358 -34.546,-0.074 -24.973,0.019 -28.69,0.086 -28.048,0.078 -31.784,0.894 -16.534,1.462 -19.669,1.508 -22.546,1.521 -21.667,1.529 -20.724,1.523 -18.721,1.515 -17.605,1.515 -23.364,1.59 -24.383,1.625 -33.197,1.691 -25.188,2.052 -34.707,2.466 -29.783,3.242 -28.813,3.258 -34.71,5.991 -29.295,6.188 -34.732,6.593 -29.521,6.751 -34.721,7.184 -33.948,11.297 -34.362,11.86 -34.29,12.643 -31.135,13.308 -30.56,17.826 -30.56,18.666 -34.209,20.059 -34.34,21.137 -32.953,22.396 -30.872,23.804 -31.808,23.816 -35.977,26.92 -34.586,26.954 -33.555,26.954
LED_VDD: CAPS.2 LED.4 U1.8 WIN.2 | length 98.8
  Top w0.18: v1(-29.48,-21.9) -29.48,-21.653 -30.468,-20.665 -30.468,-7.859 -29.094,-6.485 U1.8
  Bottom w0.18: v1(-29.48,-21.9) -29.38,-22 -29.38,-25.709 -26.225,-28.864 -13.226,-28.864 -10.589,-26.227 -10.589,-13.069 -5.508,-7.989 4.136,-7.989 5.998,-6.126 9.042,-6.126 9.762,-5.407 9.762,-3.924 9.788,-3.924 9.824,-3.887 ; LED.4 9.822,-3.89 9.824,-3.887 ; WIN.2 16.776,-3.284 ; CAPS.2 24.789,-3.629 24.444,-3.284 16.776,-3.284 ; 9.824,-3.887 10.428,-3.284 16.776,-3.284
NETANT1_1: ANT1.1 C6.2 C10.1 R23.1 R23.2 U1.1 | length 8.6
  Top w0.18: R23.1@-36.224,-3.669 R23.1 ; R23.2 -35.15,-3.682 C10.1
  Top w0.25: -31.843,-3.682 -31.027,-3.682 U1.1
  Top w0.5: C6.2 R23.1@-36.224,-3.669 ; R23.2 -35.15,-3.682 -31.843,-3.682
NETC9_2: C9.2 R9.1 R10.2 U1.45 | length 4.2
  Top w0.18: U1.45 -26.108,-1.023 -26.045,-0.961 -26.045,-0.56 C9.2 -26.054,0.346 R10.2 -26.045,1.284 R9.1
NETH1_3: LED1.1 Q1.3 | length 7.4
  Top w0.3: LED1.1 -13.064,-21.375 -11.529,-19.84 -11.529,-18.949 Q1.3
NETLED1_2: CAPS.1 R12.1 | length 1.4
  Bottom w0.18: R12.1 23.189,-5.737 CAPS.1
NETLED2_2: R13.1 WIN.1 | length 1.4
  Bottom w0.18: WIN.1 15.185,-4.376 R13.1
NETLED3_B: LED.2 R20.1 | length 20.9
  Bottom w0.18: R20.1 -9.319,-8.027 -8.951,-7.659 -8.951,-7.654 3.919,-7.654 5.819,-5.754 7.961,-5.754 7.964,-5.756 LED.2
NETLED3_G: LED.1 R19.1 | length 19.9
  Bottom w0.18: R19.1 -10.22,-9.414 -10.22,-8.258 -9.279,-7.317 ; -9.279,-7.316 3.708,-7.316 6.135,-4.89 LED.1
NETLED3_R: LED.3 R18.1 | length 21.1
  Bottom w0.18: R18.1 -11.174,-9.438 -11.174,-8.6 -11.177,-8.597 -9.559,-6.979 3.481,-6.979 6.57,-3.89 LED.3
NETQ1_1: Q1.1 R14.2 | length 1.2
  Top w0.18: Q1.1 R14.2
NETR1_1: R1.1 USB.A5 | length 2.1
  Top w0.18: v1(-33.34,15.276) R1.1
  Bottom w0.18: v1(-33.34,15.276) -31.915,15.276 USB.A5
NETR2_2: R2.2 USB.B5 | length 2.3
  Top w0.18: v1(-33.298,17.873) -33.288,17.884 R2.2
  Bottom w0.18: v1(-33.298,17.873) -32.908,18.264 USB.B5
NETR5_2: R5.2 U2.2 | length 2.3
  Top w0.18: U2.2 -30.139,6.181 -29.309,5.351 R5.2
NETR6_1: R6.1 U2.7 | length 15.7
  Top w0.18: v1(-36.729,6.128) -36.675,6.181 U2.7
  Bottom w0.18: v1(-36.729,6.128) -36.652,6.051 -36.652,0.107 -34.714,-1.831 -34.714,-1.843 -29.641,-1.843 -29.021,-2.463 R6.1
NETR11_1: R11.1 U1.30 | length 3.7
  Top w0.18: U1.30 -20.388,-6.086 -19.621,-5.319 R11.1
NETU1_47: U1.47 X1.1 | length 2.6
  Top w0.18: X1.1 -28.022,-1.254 -26.908,-2.368 U1.47
NETU1_48: U1.48 X1.3 | length 6.1
  Top w0.18: X1.3 -29.502,0.099 -29.502,-1.861 -29.049,-2.314 -27.543,-2.314 U1.48@-27.307,-2.549 ; U1.48 U1.48@-27.308,-2.55
NTC: BAT1.3 NTC.1 R3.2 R4.1 U2.1 | length 29.6
  Top w0.18: BAT1.3 -35.797,25.365 -31.242,25.365 -29.79,23.913 -29.79,12.574 NTC.1 -31.102,11.171 -31.162,11.23 v1(-31.523,11.23) ; R3.2 -31.148,3.772 -31.147,4.669 U2.1 -30.838,4.911 -30.841,4.914 -31.129,4.914 -31.595,5.381 v1(-31.603,5.381)
  Bottom w0.18: v1(-31.603,5.381) -31.742,5.52 -31.742,11.059 -31.523,11.278 v1(-31.523,11.23)
PWM: LED1.2 U1.32 | length 32.2
  Top w0.18: U1.32 -20.664,-5.286 -19.711,-4.333 -16.846,-4.333 -16.842,-4.328 -16.825,-4.328 v1(-16.533,-4.037) ; v1(-15.148,-26.617) -14.862,-26.903 LED1.2
  Bottom w0.18: v1@-16.533,-4.037 -16.533,-4.982 -15.544,-5.971 -15.544,-12.928 -14.226,-14.246 -14.226,-25.696 v1(-15.148,-26.617)
PWM_OFF: R14.1 U1.31 | length 20.3
  Top w0.18: U1.31 -20.498,-5.686 -19.544,-4.732 -17.176,-4.732 v1(-15.861,-4.732) ; v1(-13.509,-15.489) R14.1
  Bottom w0.18: v1(-15.861,-4.732) -15.146,-5.447 -15.146,-12.79 -13.787,-14.149 -13.787,-15.21 v1(-13.509,-15.489)
R0: ?.1@31.235,0.205 U1.37 | length 63.5
  Top w0.18: U1.37 -22.908,-2.355 -22.346,-1.793 -18.256,-1.793 -16.985,-3.064 v1(-16.016,-3.064) ; ?.1@31.235,0.205 31.246,0.193 v1(31.246,-3.15)
  Bottom w0.18: v1(-16.016,-3.064) -14.514,-3.064 -12.022,-5.557 2.806,-5.557 8.429,0.067 28.029,0.067 v1(31.246,-3.15)
R1: ?.1@33.035,0.205 U1.38 | length 66.1
  Top w0.18: U1.38 -23.308,-2.26 -22.469,-1.421 -18.054,-1.421 -16.925,-2.551 v1(-16.628,-2.551) ; ?.1@33.035,0.205 33.07,0.17 v1(33.07,-3.141)
  Bottom w0.18: v1(-16.628,-2.551) -14.495,-2.551 -11.834,-5.213 2.613,-5.213 8.248,0.422 29.506,0.422 v1(33.07,-3.141)
R2: ?.1@34.815,0.178 U1.39 | length 69.7
  Top w0.18: U1.39 -23.708,-2.135 -22.65,-1.077 -17.857,-1.077 -16.899,-2.036 v1(-16.029,-2.036) ; v1(34.815,-3.924) ?.1@34.815,0.178
  Bottom w0.18: v1(-16.029,-2.036) -14.487,-2.036 -11.672,-4.851 2.433,-4.851 2.576,-4.708 8.061,0.776 30.111,0.776 34.556,-3.669 34.558,-3.669 34.569,-3.68 34.571,-3.68 v1(34.815,-3.924)
R3: ?.1@42.98,0.178 U1.40 | length 83.2
  Top w0.18: U1.40 -24.108,-2.005 -22.792,-0.69 -17.691,-0.69 -16.902,-1.478 v1(-16.613,-1.478) ; v1(42.98,-7.13) ?.1@42.98,0.178
  Bottom w0.18: v1(-16.613,-1.478) -14.546,-1.478 -11.522,-4.502 2.261,-4.503 7.911,1.146 30.541,1.146 32.302,-0.615 38.582,-6.895 42.745,-6.895 v1(42.98,-7.13)
R4: ?.1@44.78,0.178 ENC.D K2.1 U1.41 | length 100.3
  Top w0.18: U1.41 -24.508,-1.868 -22.95,-0.311 -17.504,-0.311 -16.889,-0.926 v1(-16.027,-0.926) ; K2.1 -20.426,-11.558 -20.131,-11.263 ENC.D ; v1(44.78,-6.837) ?.1@44.78,0.178
  Bottom w0.18: ENC.D -18.239,-11.263 -17.671,-10.694 -17.671,-1.635 -16.976,-0.94 -16.041,-0.94 v1(-16.027,-0.926) -14.582,-0.926 -11.355,-4.154 2.062,-4.155 7.715,1.498 30.737,1.498 35.934,-3.699 38.736,-6.501 44.444,-6.501 v1(44.78,-6.837)
R5: ?.1@46.6,0.175 U1.42 | length 87.4
  Top w0.18: U1.42 -24.908,-1.722 -23.121,0.065 -17.072,0.065 v1(-16.644,-0.363) ; v1(46.6,-6.461) ?.1@46.6,0.175
  Bottom w0.18: v1(-16.644,-0.363) -14.612,-0.363 -11.18,-3.795 1.898,-3.795 1.96,-3.733 7.557,1.864 30.949,1.864 38.92,-6.107 46.246,-6.107 v1(46.6,-6.461)
R6: ?.1@48.38,0.178 U1.43 | length 89.7
  Top w0.18: U1.43 -25.308,-1.595 -23.267,0.446 -16.394,0.446 v1(-16.188,0.239) ; v1(48.38,-6.226) ?.1@48.38,0.178
  Bottom w0.18: v1(-16.188,0.239) -14.682,0.239 -11.012,-3.432 1.699,-3.432 7.356,2.226 31.17,2.226 35.874,-2.478 39.092,-5.696 47.851,-5.696 v1(48.38,-6.226)
R7: ?.1@50.2,0.175 U1.44 | length 91.5
  Top w0.18: U1.44 -25.708,-1.496 -23.372,0.84 -15.655,0.84 v1(-15.655,0.862) ; v1(50.2,-5.675) ?.1@50.2,0.175
  Bottom w0.18: v1(-15.655,0.862) -14.77,0.862 -10.842,-3.066 1.508,-3.066 7.161,2.586 31.397,2.586 39.276,-5.292 49.818,-5.292 v1(50.2,-5.675)
SGND: C12.2 R24.1 USB.1 | length 3.9
  Bottom w0.5: USB.1 -36.444,21.256 C12.2 -36.444,24.336 R24.1
USB_5V: C11.1 R7.1 USB.A4 USB.A9 USB.B4 USB.B9 | length 32.1
  Bottom w0.18: -35.65,8.701 -35.657,7.351 -35.404,7.098 -35.404,-0.555 -34.463,-1.497 -28.61,-1.497 R7.1 ; USB.B4@-31.941,18.924 USB.B4@-31.903,18.924 ; USB.A9 USB.B4@-31.903,18.924 ; USB.B4 USB.B4@-31.903,18.924
  Bottom w0.5: -35.65,8.701 -35.65,8.75 -35.65,10.04 -35.361,10.33 -35.347,10.33 C11.1@-35.321,10.356 ; C11.1 C11.1@-35.321,10.356 ; -34.271,17.976 -34.271,14.441 ; -34.271,17.977 -34.271,18.069 -33.453,18.886 -33.132,18.886 -33.095,18.924 USB.B4@-31.941,18.924 ; USB.B9@-31.903,14.153 -32.939,14.153 -33.226,14.441 -34.271,14.441 ; C11.1@-35.321,10.356 -35.304,10.356 -35.09,10.569 -35.09,13.277 -35.074,13.277 -34.271,14.079 -34.271,14.441
VBAT: C3.2 D7.2 LED1.3 S1.2 U3.3 VBAT.1 | length 74.7
  Top w0.35: v1(-17.877,-30.236) VBAT.1 -15.794,-28.153 LED1.3
  Bottom w0.35: D7.2 -32.702,6.487 -33.152,6.038 -33.152,3.829 -32.609,3.286 -32.609,2.15 -32.365,1.906 -31.397,1.906 S1.2 -31.133,1.935 -30.779,2.289 -28.171,2.289 -21.85,-4.032 -20.989,-4.032 -18.607,-6.414 -18.607,-8.959 -19.091,-9.442 -25.208,-9.442 -28.097,-12.331 ; U3.3 -29.24,-11.741 C3.2 -28.727,-12.363 -28.719,-12.37 -28.136,-12.37 -28.097,-12.331 ; v1(-17.877,-30.236) -18.076,-30.022 -26.941,-30.022 -30.71,-26.252 -30.71,-22.602 -31.273,-22.039 -31.273,-20.817 -30.357,-19.9 -30.357,-14.605 -28.097,-12.345 -28.097,-12.331
VCC: C4.2 C7.1 C8.1 U1.28 U1.33 U3.2 VCC.1 | length 21.4
  Top w0.18: U1.28 -19.881,-6.886 v1(-19.601,-6.606) ; U1.33 -21.38,-4.886 v1(-21.202,-4.708) -21.193,-4.699 -20.664,-4.699 -19.845,-3.881 -19.421,-3.881 -18.831,-3.291 VCC.1
  Bottom w0.18: U3.2 -27.628,-8.83 C4.2 -19.545,-8.931 -19.444,-8.83 C7.1 -19.444,-7.234 C8.1 -19.446,-7.191 -19.446,-6.756 -19.596,-6.606 v1(-19.601,-6.606) -19.601,-6.055 -20.949,-4.708 v1(-21.202,-4.708)
VPP: R11.2 U1.29 VPP.1 | length 4.8
  Top w0.18: U1.29 -20.257,-6.486 -19.818,-6.047 -19.087,-6.047 R11.2 -17.672,-6.369 VPP.1
WHA: ENC.B U1.6 ZA.1 | length 33.2
  Top w0.18: U1.6@-28.146,-5.685 -29.397,-5.685 -31.273,-7.561 -31.273,-21.406 -28.625,-24.054 -21.181,-24.054 -19.55,-25.685 ENC.B -19.546,-25.767 ZA.1 ; U1.6@-28.145,-5.686 U1.6
WHB: ENC.A U1.5 ZB.1 | length 29.3
  Top w0.18: U1.5 -29.571,-5.286 -31.657,-7.372 -31.657,-21.547 -31.649,-21.555 -31.641,-21.555 -27.483,-25.713 -24.6,-25.713 ENC.A -24.588,-25.8 ZB.1
pads on no net: B-.1 BAT1.9 BAT1.12 GND1.1 S1.3 S1.8 S1.9 U1.2 U1.3 U1.34 U2.6 USB.2 USB.3 USB.4 USB.5 USB.6 USB.7 USB.A8 USB.B8

## Keep-outs
Keep-Out Layer:
  lines w0.1: -35.946,-30.021 -32.968,-30.021 ; -35.947,-30.02 cw(c-35.328,-28.935) -35.945,-27.848 ; -35.946,-27.849 -32.968,-27.849 ; -32.969,-27.848 cw(c-33.416,-28.935) -32.967,-30.02 ; -29.499,9.508 -29.507,9.566 -29.507,27.696 -37.575,27.696 -37.575,-20.248 -34.6,-20.248 cw(c-34.6,-22.998) -34.6,-25.748 -37.575,-25.748 -37.575,-30.09 ccw(c-35.574,-30.09) -35.574,-32.09 -8.075,-32.09 -8.075,-17.291 cw(c-0.075,-17.291) -0.075,-9.291 54.008,-9.291 54.008,3.713 -14.545,3.713 ; -29.499,9.516 ccw(c-21.996,9.529) -22.023,2.026 ; -22.017,2.026 -16.177,2.026 ; -16.176,2.027 ccw(c-23.051,10.308) -14.547,3.711 ; -2.6,0.002 2.6,0.002 ; 36.4,0.002 41.6,0.002 ; 50.58,-7.313 52.78,-7.313

## Silkscreen, mask and mechanical layers (free items; w line width, h text height)
Silkscreen Top:
  text "K882_6252(CD) V1.0" at -8.065,-7.271 h0.6
  text "20251210" at -7.6,-8.479 h0.6
  text "H=1.2mm" at -2.026,-8.479 h0.6
  text "+" at -9.677,-11.422 h0.6 r90
  text "-" at -8.074,-11.425 h0.6 r90
Paste Mask Top:
  lines w0.003: -68.615,-15.794 -68.321,-16.068 -68.044,-16.068 -67.751,-15.794 -67.751,-15.29 -67.815,-15.226 -68.551,-15.226 -68.615,-15.29 -68.615,-15.794 ; -68.603,-17.361 -68.603,-16.858 -68.31,-16.584 -68.033,-16.584 -67.739,-16.858 -67.739,-17.361 -67.803,-17.425 -68.539,-17.425 -68.603,-17.361
Mechanical 3:
  drawing of 835 lines, arcs and shapes, not listed
Mechanical 15:
  lines w0.003: -68.567,-17.132 -68.567,-16.832 -67.767,-16.832 -67.767,-17.132 -68.567,-17.132 ; -68.567,-15.832 -68.567,-15.532 -67.767,-15.532 -67.767,-15.832 -68.567,-15.832 ; -67.767,-17.192 -67.767,-17.072 -67.767,-17.192